# Altium PCB PWR Board 10A.PcbDoc (part 8 of 10)
Units mm, origin at the board's own origin, x right, y up, seen from the top; angles counter-clockwise.
Board outline 355 x 325 mm, 4 copper layers (Top Layer, Layer 1, Layer 2, Bottom Layer), stack 1.636 mm thick; 617 components, 308 nets, 1518 pads, 1199 vias.
Unrouted connection lines stored in the file: 361.
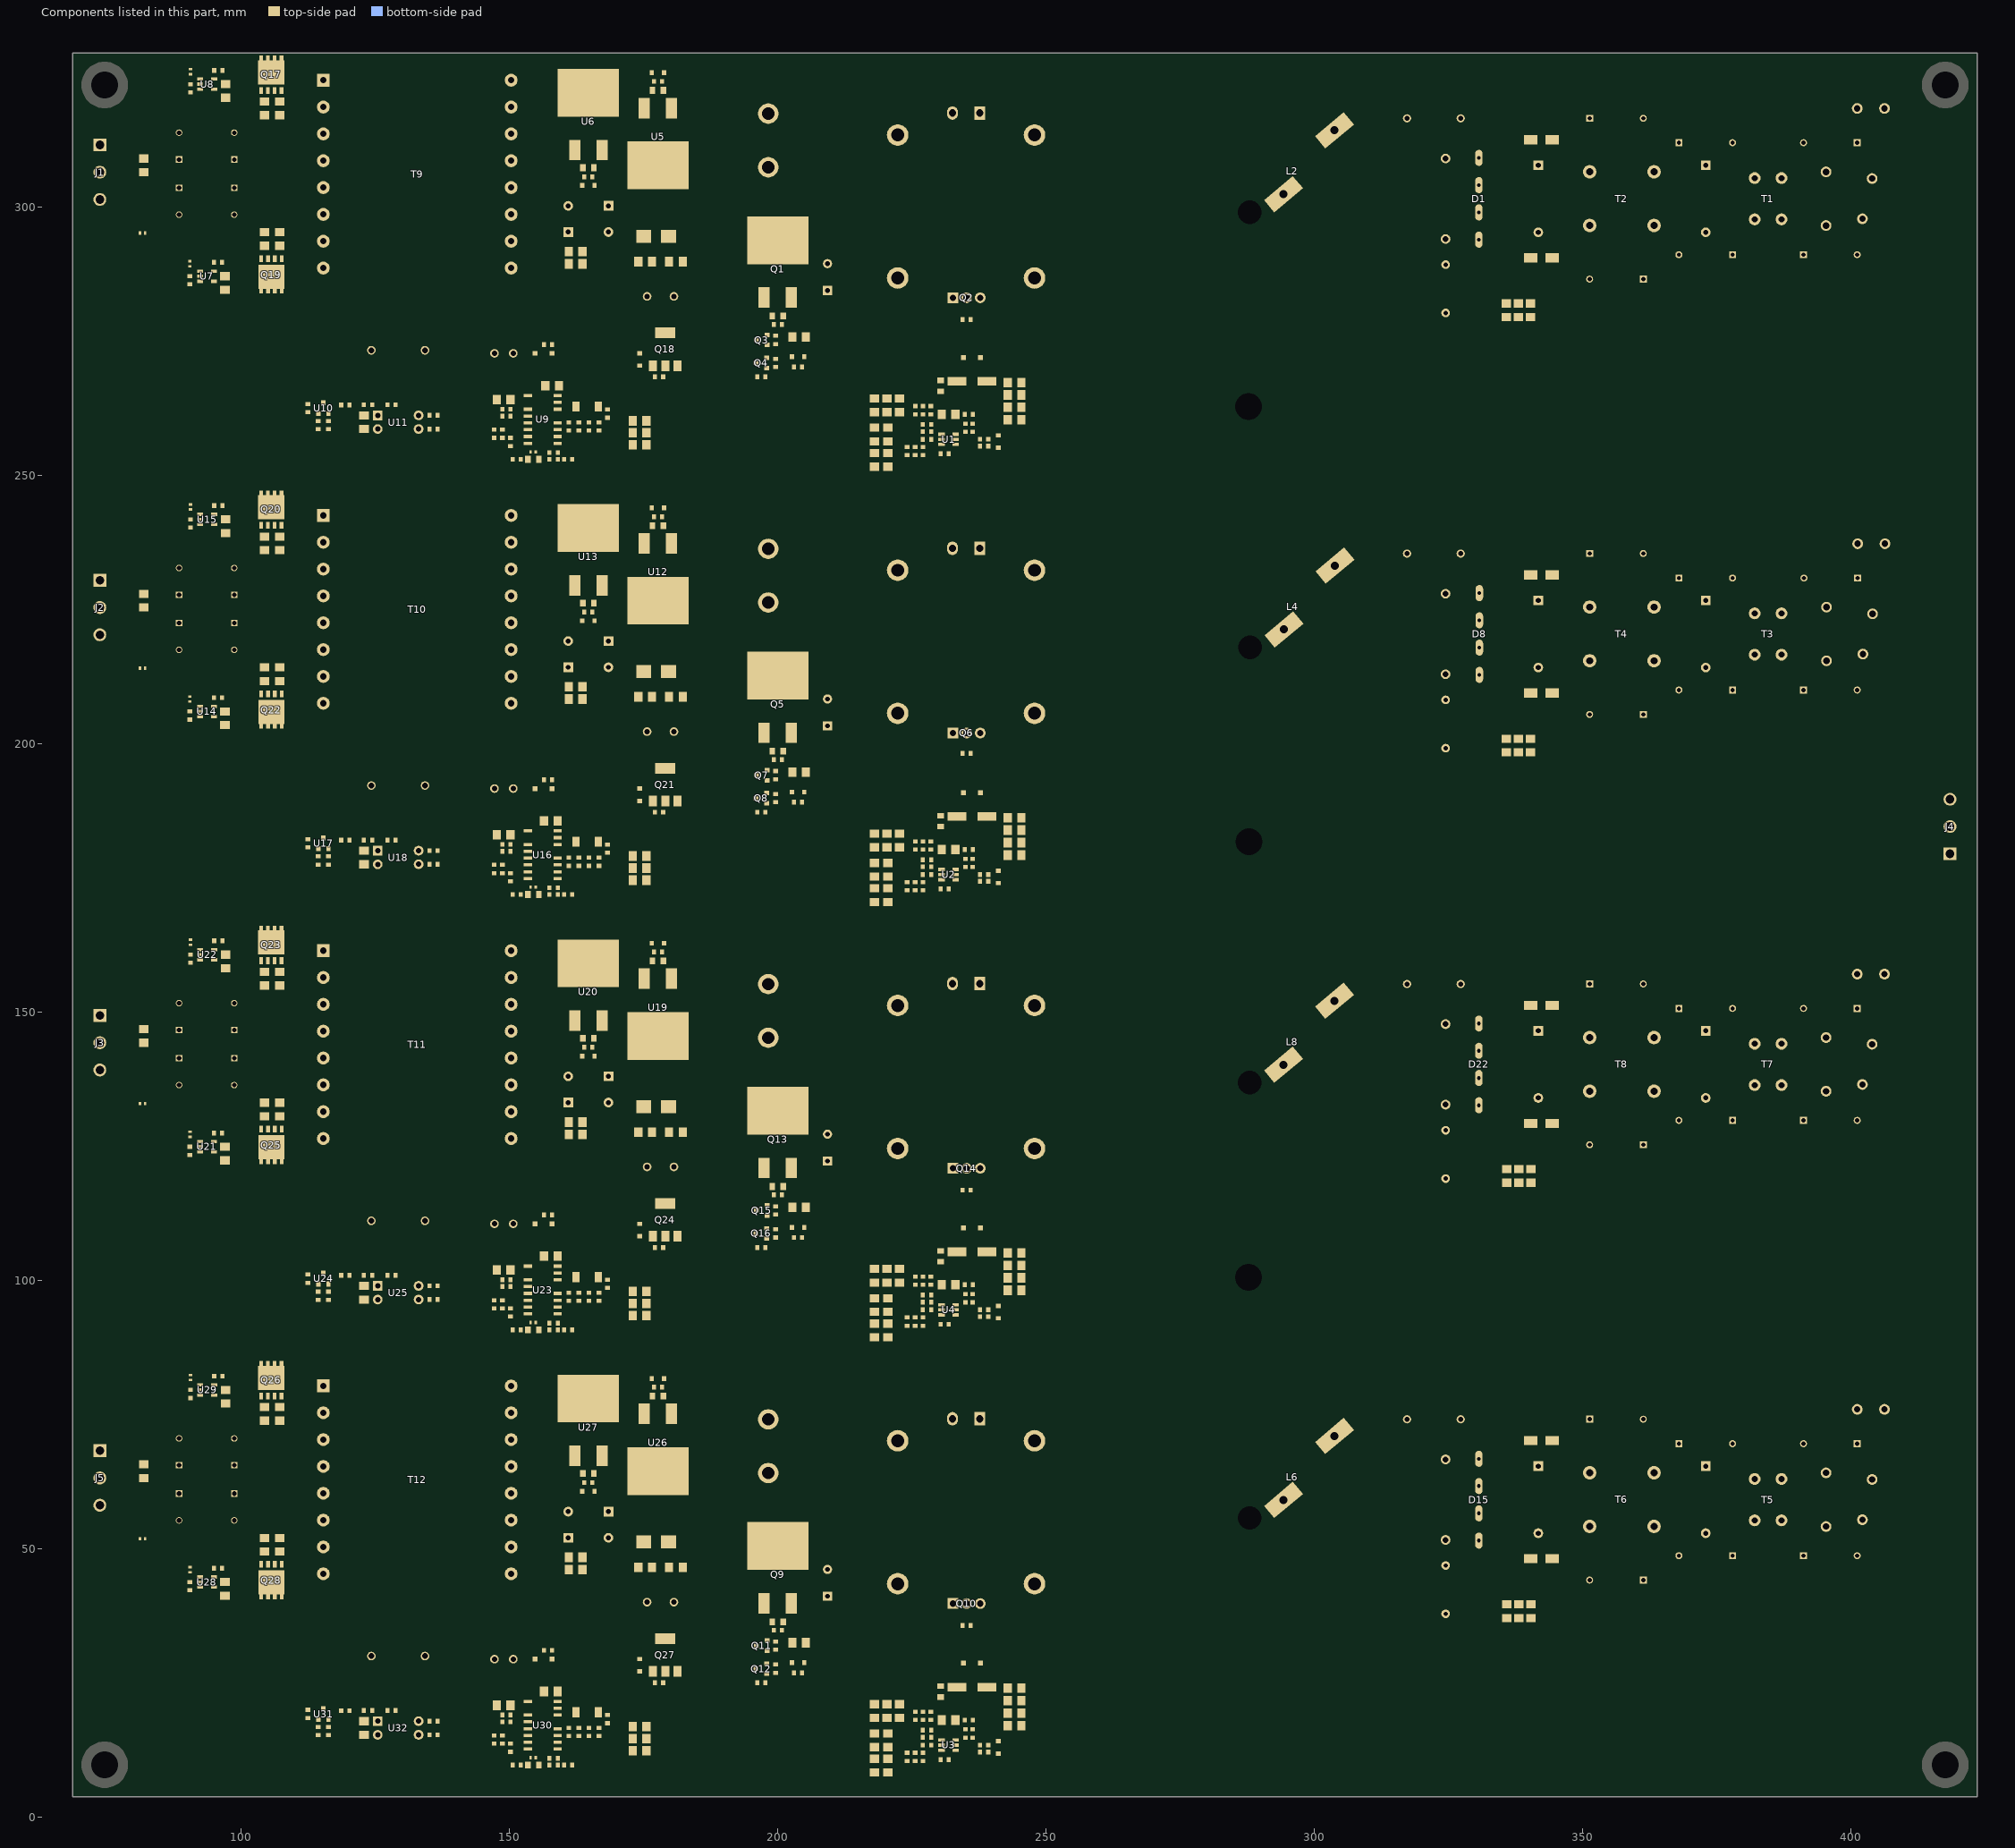
[diagram p6: the components of this part, seen from the top]

## Polygon pours and split planes (outlines as drawn) (continued)
NetC74_2 on Bottom Layer "NETC74_2_L04_P127" (solid, pour order 127): 300.025,149.848 308.432,141.441 308.432,117.768 326.923,117.768 326.923,125.693 319.278,125.693 319.278,157.291 300.025,157.291
NetC5_2 on Bottom Layer "NETC5_2_L04_P126" (solid, pour order 126): 300.025,311.15 308.432,302.743 308.432,279.07 326.923,279.07 326.923,286.995 319.278,286.995 319.278,318.592 300.025,318.592
NetC28_2 on Bottom Layer "NETC28_2_L04_P125" (solid, pour order 125): 300.025,230.048 308.432,221.64 308.432,197.968 326.923,197.968 326.923,205.892 319.278,205.892 319.278,237.49 300.025,237.49
NetC49_2 on Bottom Layer "NETC49_2_L04_P124" (solid, pour order 124): 353.085,42.99 353.085,58.662 329.463,58.662 329.463,54.395 335.737,54.395 335.737,51.461 345.846,51.461 345.846,42.99
NetC54_1 on Bottom Layer "NETC54_1_L04_P123" (solid, pour order 123): 353.085,74.969 353.085,59.5 329.463,59.5 329.463,63.768 335.737,63.768 335.737,66.701 345.846,66.701 345.846,74.969
NetC72_2 on Bottom Layer "NETC72_2_L04_P121" (solid, pour order 121): 353.085,124.092 353.085,139.764 329.463,139.764 329.463,135.497 335.737,135.497 335.737,132.564 345.846,132.564 345.846,124.092
NetC77_1 on Bottom Layer "NETC77_1_L04_P120" (solid, pour order 120): 353.085,156.071 353.085,140.603 329.463,140.603 329.463,144.87 335.737,144.87 335.737,147.804 345.846,147.804 345.846,156.071
NetC26_2 on Bottom Layer "NETC26_2_L04_P115" (solid, pour order 115): 353.085,204.291 353.085,219.963 329.463,219.963 329.463,215.696 335.737,215.696 335.737,212.762 345.846,212.762 345.846,204.291
NetC31_1 on Bottom Layer "NETC31_1_L04_P114" (solid, pour order 114): 353.085,236.27 353.085,220.801 329.463,220.801 329.463,225.069 335.737,225.069 335.737,228.002 345.846,228.002 345.846,236.27
HV_S-C2 on Bottom Layer "HV_S-C2_L04_P113" (solid, pour order 113): 335.737,241.833 359.791,241.833 359.791,198.78 335.737,198.78 335.737,211.861 343.713,211.861 343.713,203.504 354.178,203.504 354.178,236.956 343.713,236.956 343.713,228.853 335.737,228.853
NetC3_2 on Bottom Layer "NETC3_2_L04_P112" (solid, pour order 112): 353.085,285.394 353.085,301.066 329.463,301.066 329.463,296.799 335.737,296.799 335.737,293.865 345.846,293.865 345.846,285.394
NetC8_1 on Bottom Layer "NETC8_1_L04_P111" (solid, pour order 111): 353.085,317.373 353.085,301.904 329.463,301.904 329.463,306.172 335.737,306.172 335.737,309.105 345.846,309.105 345.846,317.373
PGND-C2 on Bottom Layer "PGND-C2_L04_P101" (solid, pour order 101): 69.571,227 69.571,181.28 84.912,181.28 84.912,219.049 81.077,219.049 81.077,227
NetD48_1 on Bottom Layer "NETD48_1_L04_P085" (solid, pour order 85): 172.949,84.886 181.102,76.733 181.102,48.539 170.663,48.539 170.663,70.383 168.91,72.136 139.547,72.136 139.547,84.886
NetC199_2 on Bottom Layer "NETC199_2_L04_P084" (solid, pour order 84): 162.636,59.232 162.636,47.294 147.549,47.294 147.549,59.232 158.394,59.232
NetD42_1 on Bottom Layer "NETD42_1_L04_P069" (solid, pour order 69): 172.949,165.989 181.102,157.835 181.102,129.641 170.663,129.641 170.663,151.485 168.91,153.238 139.548,153.238 139.548,165.989
NetC164_2 on Bottom Layer "NETC164_2_L04_P068" (solid, pour order 68): 162.636,140.335 162.636,128.397 147.549,128.397 147.549,140.335 158.394,140.335
SGND-C2 on Bottom Layer "SGND-C2_L04_P049" (solid, pour order 49): 85.573,181.28 95.377,181.28 95.377,202.565 100.813,202.565 100.813,209.22 107.239,209.22 107.239,215.671 111.887,215.671 111.887,239.903 100.99,239.903 100.99,247.142 85.573,247.142 85.573,231.114 90.018,231.114 90.018,219.049 85.573,219.049
NetC129_2 on Bottom Layer "NETC129_2_L04_P047" (solid, pour order 47): 162.636,221.437 162.636,209.499 147.549,209.499 147.549,221.437 158.394,221.437
NetC94_2 on Bottom Layer "NETC94_2_L04_P033" (solid, pour order 33): 162.636,302.539 162.636,290.601 147.549,290.601 147.549,302.539 158.394,302.539
NetD30_1 on Bottom Layer "NETD30_1_L04_P037" (solid, pour order 37): 172.949,328.193 181.102,320.04 181.102,291.846 170.663,291.846 170.663,313.69 168.91,315.443 139.548,315.443 139.548,328.193
NetD5_2 on Bottom Layer "NETD5_2_L04_P022" (solid, pour order 22): 228.956,285.166 233.705,285.166 233.705,269.189 241.503,261.391 241.503,258.013 236.398,258.013 228.956,265.455
AC_L on Bottom Layer "AC_L_L04_P000" (solid, pour order 0): 406.883,229.108 404.876,229.108 404.876,298.806 406.476,298.806 406.476,310.007 404.52,310.007 404.52,319.989 423.266,319.989 423.266,67.64 404.901,67.64 404.901,126.721 406.883,126.721 406.883,149.022 403.835,149.022 403.835,160.68 370.434,160.68 370.434,206.451 403.835,206.451 403.835,211.48 406.883,214.528
PGND-C1 on Layer 1 "PGND-C1_L02_P203" (solid, pour order 203): 79.437,328.421 79.368,328.23 79.978,327.611 80.466,326.981 81.217,325.578 81.641,324.044 81.622,321.663 80.999,319.777 80.4,318.745 79.027,317.31 78.379,316.848 77.684,316.461 77.123,316.215 77.123,252.374 84.311,252.374 84.311,328.421
PGND-C2 on Layer 1 "PGND-C2_L02_P202" (solid, pour order 202): 84.311,247.319 77.123,247.319 77.123,171.271 84.311,171.271
PGND-C3 on Layer 1 "PGND-C3_L02_P201" (solid, pour order 201): 84.311,166.217 77.123,166.217 77.123,90.169 84.311,90.169
PGND-C4 on Layer 1 "PGND-C4_L02_P200" (solid, pour order 200): 84.311,85.114 77.123,85.114 77.123,49.91 84.311,49.91
SGND-C4 on Layer 1 "SGND-C4_L02_P199" (solid, pour order 199): 124.485,11.891 cw(c127.497,54.488) 84.794,54.489 84.794,85.114 124.485,85.114
SGND-C3 on Layer 1 "SGND-C3_L02_P198" (solid, pour order 198): 124.485,166.217 84.794,166.217 84.794,90.169 124.485,90.169
SGND-C2 on Layer 1 "SGND-C2_L02_P197" (solid, pour order 197): 124.485,247.319 84.794,247.319 84.794,171.271 124.485,171.271
SGND-C1 on Layer 1 "SGND-C1_L02_P196" (solid, pour order 196): 124.485,328.421 84.794,328.421 84.794,252.374 124.485,252.374
GND on Layer 1 "GND_L02_P169" (solid, pour order 169): 332.969,328.092 332.969,307.34 314.452,307.34 314.452,248.412 332.969,248.412 332.969,226.568 314.452,226.568 314.452,168.224 332.969,168.224 332.969,146.304 314.452,146.304 314.452,88.214 332.969,88.214 332.969,65.024 314.452,65.024 314.452,11.557 131.724,11.557 131.724,328.092
EARTH on Layer 1 "EARTH_L02_P099" (solid, remove dead copper, pour order 99): 76.098,52.426 ccw(c119.532,52.426) 119.532,8.992 358.546,8.992 358.546,328.682 423.618,328.682 423.618,3.682 68.618,3.682 68.618,328.682 76.098,328.682
EARTH on Layer 2 "EARTH_L03_P211" (solid, remove dead copper, pour order 211): 423.618,328.682 358.546,328.682 358.546,3.682 423.618,3.682
SGND-C4 on Layer 2 "SGND-C4_L03_P191" (solid, pour order 191): 84.861,11.557 124.46,11.557 124.46,84.886 84.861,84.886
PGND-C1 on Layer 2 "PGND-C1_L03_P195" (solid, pour order 195): 68.618,312.225 68.618,315.602 74.689,315.512 76.652,315.75 77.752,316.233 78.447,316.62 79.095,317.082 80.467,318.517 81.067,319.549 81.689,321.435 81.709,323.816 81.285,325.35 80.534,326.753 80.046,327.383 79.436,328.002 79.504,328.193 84.379,328.193 84.379,252.146 68.618,252.146
SGND-C1 on Layer 2 "SGND-C1_L03_P185" (solid, pour order 185): 124.46,328.193 84.861,328.193 84.861,252.146 124.46,252.146
PGND-C2 on Layer 2 "PGND-C2_L03_P194" (solid, pour order 194): 84.379,247.091 68.618,247.091 68.618,171.043 84.379,171.043
SGND-C2 on Layer 2 "SGND-C2_L03_P189" (solid, pour order 189): 124.46,247.091 84.861,247.091 84.861,171.043 124.46,171.043
PGND-C3 on Layer 2 "PGND-C3_L03_P193" (solid, pour order 193): 84.379,165.989 68.618,165.989 68.618,89.941 84.379,89.941
SGND-C3 on Layer 2 "SGND-C3_L03_P190" (solid, pour order 190): 124.46,165.989 84.861,165.989 84.861,89.941 124.46,89.941
PGND-C4 on Layer 2 "PGND-C4_L03_P192" (solid, pour order 192): 74.776,16.851 73.596,16.791 72.823,16.636 71.35,16.077 70.668,15.681 69.889,15.077 69.745,14.943 69.745,14.042 68.618,14.042 68.618,16.851 68.618,84.886 84.379,84.886 84.379,16.851 84.353,16.851 84.353,11.557 81.509,11.557 81.509,11.7 80.903,13.154 80.24,14.131 79.135,15.25 78.497,15.712 77.459,16.277 75.953,16.738
GND on Layer 2 "GND_L03_P163" (solid, pour order 163): 332.969,328.682 332.969,307.125 314.452,307.125 314.452,248.412 332.969,248.412 332.969,226.022 314.452,226.022 314.452,168.224 332.969,168.224 332.969,145.823 314.452,145.823 314.452,88.214 332.969,88.214 332.969,64.721 314.452,64.721 314.452,11.557 131.724,11.557 131.724,328.682